# Altium PCB EEM_FMC_Carrier.PcbDoc (part 14 of 19)
Units mm, origin at the board's own origin, x right, y up, seen from the top; angles counter-clockwise.
Board outline 222.9 x 100 mm, 6 copper layers (TopLayer, MidLayer1, MidLayer2, SignalLayer1, Internal Plane 1, BottomLayer), stack 1.528 mm thick; 790 components, 743 nets, 3570 pads, 2277 vias.
Unrouted connection lines stored in the file: 3.
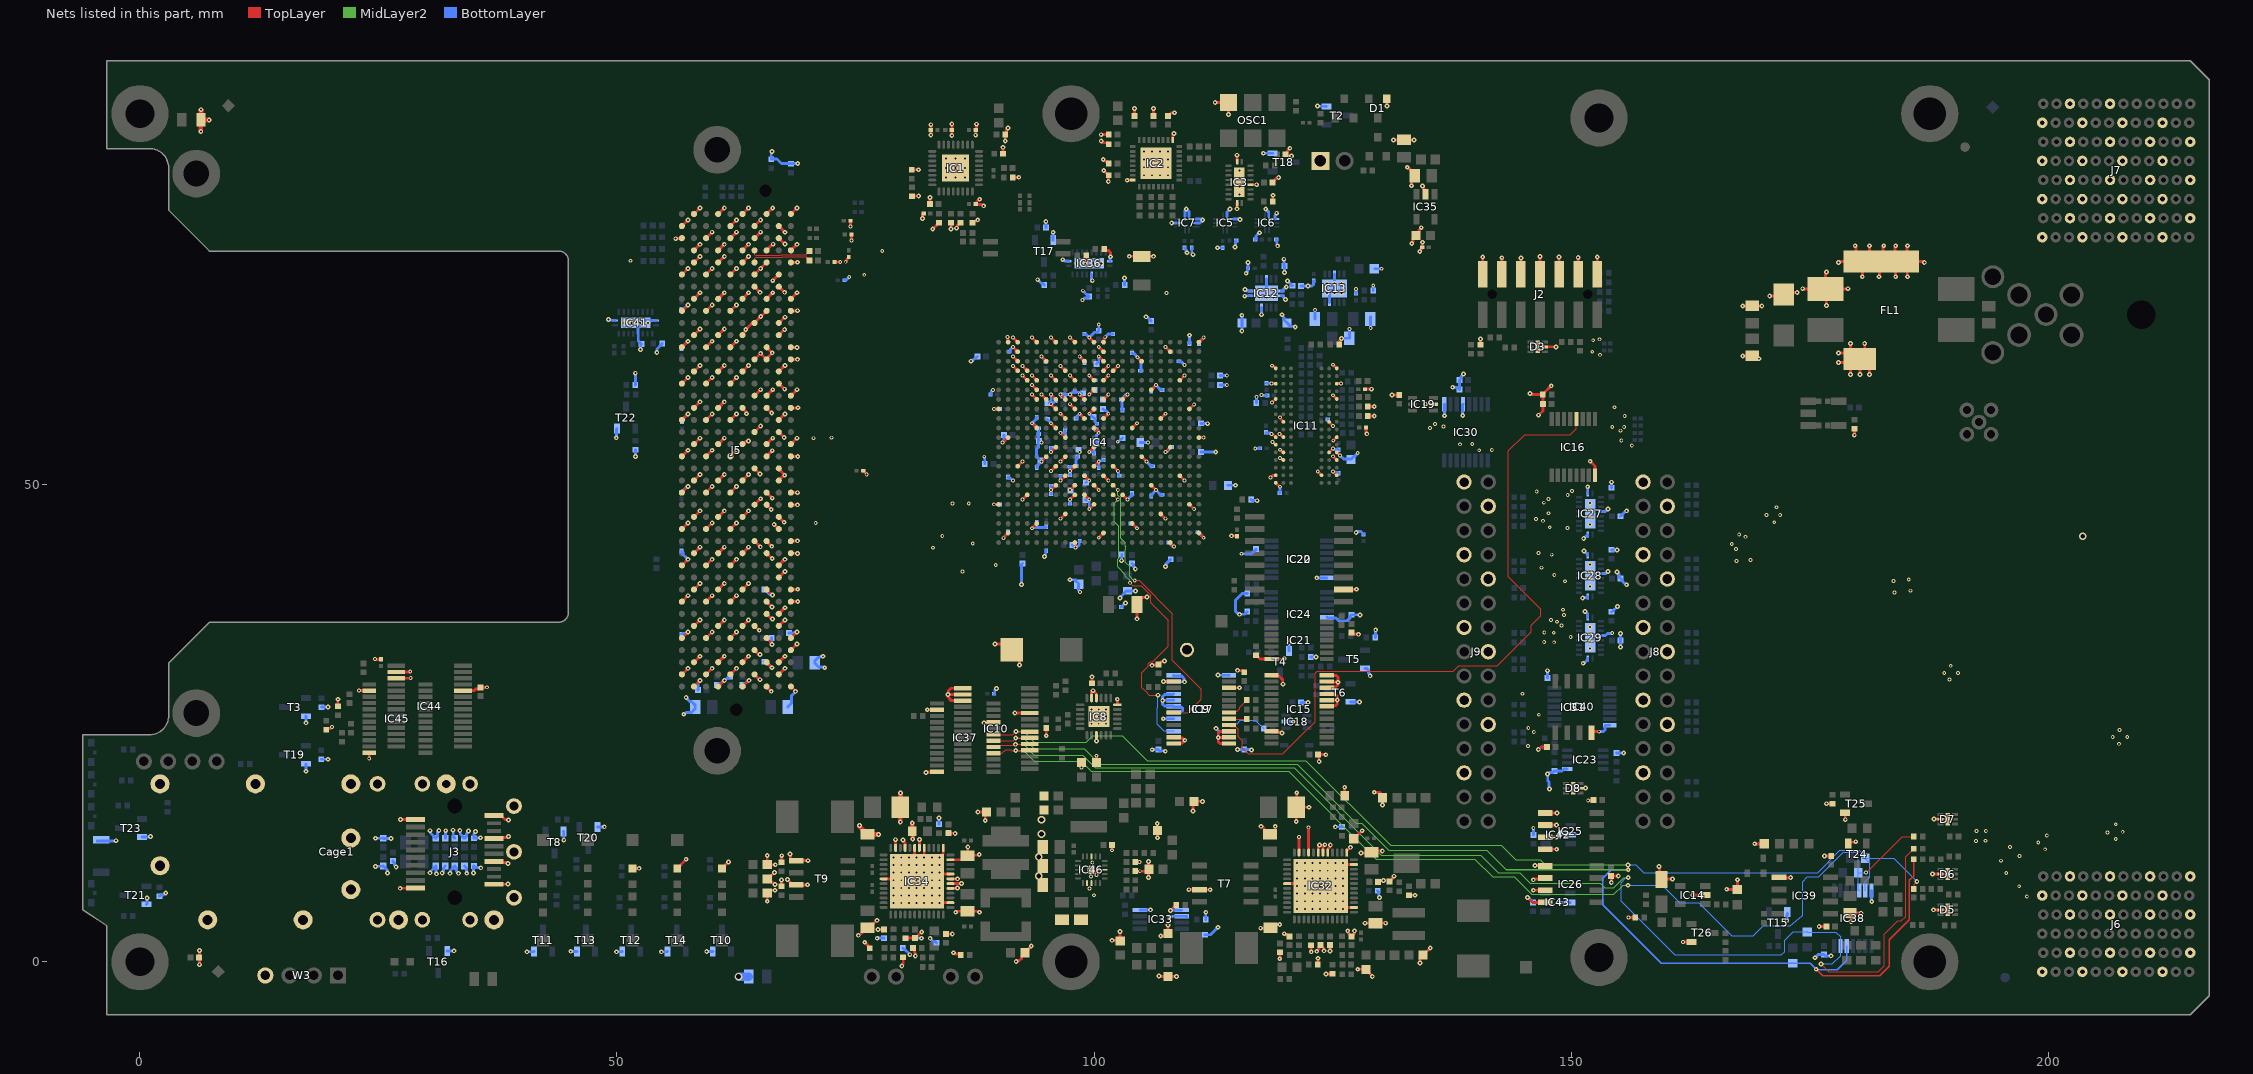
[diagram p16: the nets of this part, all layers, seen from the top]

## Via types
v1: diameter 0.4, hole 0.2, TopLayer to BottomLayer, tented both sides, 1032 vias
v2: diameter 0.5, hole 0.2, TopLayer to BottomLayer, tented both sides, 979 vias
v3: diameter 0.5, hole 0.2, TopLayer to BottomLayer, 162 vias
v4: diameter 0.8, hole 0.5, TopLayer to BottomLayer, tented both sides, 102 vias
v5: diameter 0.6, hole 0.3, TopLayer to BottomLayer, tented both sides, 2 vias

## Nets (pads, with @x,y where several pads share a name; then routed paths per layer and width w, separated by ;. In a path a pad name is that pad's centre, name@x,y a point inside that pad or via, vN(x,y) a via of type N, cw(c..) or ccw(c..) an arc to the next point about the centre after c; other vN are vias at no path point) (continued)
FPGA_JTAG.TDO: IC4.U13 IC17.3 | length 31.9
  TopLayer w0.125: IC4.U13@101.998,48.95 v1(102.498,48.45) ; v1(103.773,39.725) 104.073,39.425 104.941,39.425 105.953,38.413 105.953,37.645 107.798,35.8 107.798,33.1 106.175,31.477 105.907,31.477 105.672,31.241 105.672,30.973 105.023,30.325 105.023,28.716 105.4,28.339 105.409,28.339 105.798,27.95 v2(106.698,27.95)
  MidLayer2 w0.125: v1(102.498,48.45) 102.098,48.05 102.098,46.15 102.598,45.65 102.598,42.324 102.485,42.211 102.485,41.398 103.3,40.583 103.3,40.44 103.745,39.995 103.745,39.753 v1(103.773,39.725)
  BottomLayer w0.125: v2(106.698,27.95) 106.698,26.693 106.622,26.616 106.622,26.284 106.648,26.257 106.648,24.925 107.334,24.239 108.284,24.239 IC17.3@108.348,24.175
FPGA_JTAG.TMS: IC4.T13 IC9.7 | length 30.1
  TopLayer w0.1: v1(104.273,39.975) 104.723,39.975 108.223,36.475 108.223,31.6 111.237,28.586 111.237,27.514 109.848,26.125 IC9.7@108.348,26.125
  TopLayer w0.125: IC4.T13@101.998,49.95 v1(102.498,49.45)
  MidLayer2 w0.1: v1(102.498,49.45) 102.498,48.929 102.798,48.629 102.798,48.611 102.824,48.585 102.824,44.424 103.298,43.95 103.298,43.536 103.324,43.51 103.324,43.24 103.298,43.214 103.298,41.9 103.723,41.475 103.723,40.428 104.077,40.074 104.093,40.074 104.192,39.975 v1(104.273,39.975)
FPGA_JTAG_3V3.TCK: IC9.18 R91.2 | length 2.5
  TopLayer w0.125: IC9.18@114.148,26.125 114.293,26.27 114.993,26.27 115.273,26.55 115.273,26.695 115.781,27.203 115.801,27.203 116.028,27.43 R91.2@116.028,27.45
FPGA_JTAG_3V3.TDI: IC9.16 IC16.12 | length 72
  TopLayer w0.125: IC9.16@114.148,24.825 114.311,24.663 114.861,24.663 115.123,24.4 115.123,23.613 115.548,23.188 115.548,22.4 116.15,21.799 119.797,21.799 121.473,23.475 123.173,25.175 123.173,30.223 123.425,30.475 137.675,30.475 138.25,31.05 142.275,31.05 145.832,34.607 145.832,35.266 146.825,36.259 146.825,36.975 143.436,40.364 143.436,53.56 145.125,55.25 149.925,55.25 150.534,55.859 150.534,56.861 IC16.12@150.573,56.9
FPGA_JTAG_3V3.TDO: IC17.21 R96.1 | length 4.2
  BottomLayer w0.125: IC17.21@114.148,24.825 114.293,24.97 114.993,24.97 115.348,25.325 116.903,25.325 117.53,24.697 117.55,24.697 117.778,24.47 R96.1@117.778,24.45
FPGA_JTAG_3V3.TMS: IC9.17 R89.2 | length 1.9
  TopLayer w0.125: IC9.17@114.148,25.475 114.173,25.45 R89.2@116.028,25.45
GA0: IC10.7 IC37.19 IC38.6 R38.1 R262.2 | length 112.1
  TopLayer w0.09: IC37.19@89.45,23.825 91.498,23.825 v2(91.823,24.15)
  TopLayer w0.114: R38.1@185.93,7.725 185.964,7.759 185.964,8.139 v2(186.25,8.425)
  TopLayer w0.125: v2@91.848,24.125 IC10.7@93.248,24.125
  MidLayer2 w0.09: 144.204,10.7 146.775,10.7 147.322,10.153 v2(155.976,10.153)
  MidLayer2 w0.125: v2(91.823,24.15) 92.623,24.15 93.748,23.025 99.175,23.025 99.85,23.7 102.964,23.7 105.564,21.1 122.21,21.1 131.085,12.225 142.679,12.225 144.204,10.7
  BottomLayer w0.09: v2(155.976,10.153) 156.797,10.153 157.609,9.341
  BottomLayer w0.114: 157.609,9.341 175.841,9.341 178.191,11.691 180.209,11.691 180.468,11.432 180.468,11.232 R262.2@180.85,10.85 ; IC38.6@180.848,7.475 IC38.6@180.848,7.475 180.85,8.425 181.3,8.875 181.3,10.35 180.85,10.8 R262.2@180.85,10.85 ; v2(186.25,8.425) 183.825,10.85 R262.2@180.85,10.85
GA1: IC10.6 IC37.18 IC38.12 R39.1 R260.2 | length 130.5
  TopLayer w0.09: IC37.18@89.45,23.175 91.523,23.175 v2(91.798,23.45)
  TopLayer w0.125: v2@91.823,23.475 IC10.6@93.248,23.475
  TopLayer w0.15: v2(175.7,-0.775) 176.4,-1.475 182.35,-1.475 183.35,-0.475 183.35,2.3 185.476,4.426 185.476,8.526 185.93,8.98 R39.1@185.93,10.75
  MidLayer2 w0.125: v2(91.798,23.45) 92.623,23.45 93.748,22.325 98.975,22.325 100.6,20.7 121.325,20.7 127.5,14.525 128.05,14.525 130.9,11.675 141.175,11.675 143.204,9.646
  MidLayer2 w0.15: 143.204,9.646 v2(155.998,9.646)
  BottomLayer w0.15: v2(155.998,9.646) 154.221,9.646 153.35,8.775 153.35,5.975 159.475,-0.15 R260.2@173.25,-0.15 175.075,-0.15 175.739,-0.814 177.911,-0.814 178.898,0.173 IC38.12@178.898,1.675
GA2: IC10.5 IC37.17 IC38.13 R40.1 R197.2 | length 130.3
  TopLayer w0.09: IC37.17@89.45,22.525 89.63,22.705 91.567,22.705 91.662,22.8 v2(91.773,22.8)
  TopLayer w0.114: v2(176.2,-0.225) 177.025,-1.05 182.2,-1.05 182.825,-0.425 182.825,2.875 184.25,4.3 184.625,4.3 185.075,4.75 185.075,10.995 185.677,11.597 185.697,11.597 185.93,11.83 R40.1@185.93,11.85
  TopLayer w0.125: v2@91.798,22.825 IC10.5@93.248,22.825
  MidLayer2 w0.114: 142.375,9.325 144.625,9.325 145.737,8.213 153.05,8.213 153.513,7.75 154.475,7.75 155.55,8.825 v2(155.998,8.825)
  MidLayer2 w0.125: v2(91.773,22.8) 92.623,22.8 93.748,21.675 98.8,21.675 100.15,20.325 120.967,20.325 130.117,11.175 140.525,11.175 142.375,9.325
  BottomLayer w0.114: v2(155.998,8.825) 155.926,8.753 155.703,8.753 155.25,8.3 155.25,6.35 160.875,0.725 172.05,0.725 172.4,1.075 172.4,2.275 173.269,3.144 174.756,3.144 R197.2@174.775,3.125 177.725,3.125 178.248,2.602 IC38.13@178.248,1.675 178.248,0.648 177.375,-0.225 v2(176.2,-0.225)
GA3: IC10.4 IC37.16 IC38.5 R270.1 R282.2 | length 118.1
  TopLayer w0.09: v1(180.925,9.35) 184.7,13.125 R270.1@185.93,13.125
  TopLayer w0.125: IC37.16@89.45,21.875 90.35,21.875 90.725,22.25 91.3,22.25 91.4,22.15 v2(91.798,22.15) ; v2@91.823,22.175 IC10.4@93.248,22.175
  MidLayer2 w0.125: v2(91.798,22.15) 92.623,22.15 93.748,21.025 98.65,21.025 99.725,19.95 120.423,19.95 129.598,10.775 139.925,10.775 141.8,8.9 144.05,8.9 145.875,7.075 154.5,7.075 155.45,8.025 v2(155.975,8.025)
  BottomLayer w0.09: v2(155.975,8.025) 159.55,8.025 161.4,6.175 163.375,6.175 166.825,2.725 169.1,2.725 170.15,3.775 172.975,3.775 174.236,4.854 174.264,4.883 174.264,8.414 174.775,8.925 175.975,8.925 178.55,11.5 179.825,11.5 180.1,11.225 R282.2@180.1,9.35 ; IC38.5@180.198,7.475 180.1,7.573 R282.2@180.1,9.35 ; v1(180.925,9.35) R282.2@180.1,9.35
GBTCLK0_M2C_N: C200.1 J5.d5 | length 6.5
  TopLayer w0.085: J5.d5@64.418,73.309 64.438,73.328 64.438,73.757 64.518,73.838 67.324,73.838 67.38,73.894 69.861,73.894 69.911,73.844 69.911,73.762 C200.1@70.173,73.5
GBTCLK0_M2C_P: C199.1 J5.d4 | length 6.5
  TopLayer w0.085: J5.d4@64.418,74.579 64.438,74.559 64.438,74.131 64.518,74.05 67.236,74.05 67.292,74.106 69.861,74.106 69.911,74.156 69.911,74.238 C199.1@70.173,74.5
GND: B1.1 C14.1 C15.1 C17.1 C18.1 C19.1 C20.2 C22.1 C23.1 C24.1 C25.1 C26.1 C27.1 C28.1 C31.1 C32.1 C33.1 C34.1 C35.1 C36.1 C37.1 C38.1 C39.1 C40.1 C41.1 C42.1 C43.2 C44.1 C45.1 C46.1 C47.1 C48.1 C49.1 C50.1 C51.1 C61.1 C62.1 C63.1 C64.1 C65.1 C66.1 C67.1 C68.1 C69.1 C70.1 C71.1 C72.1 C74.1 C75.1 C76.1 C77.1 C78.1 C79.1 C80.1 C81.1 C82.1 C83.1 C84.1 C85.1 C86.1 C87.1 C88.1 C89.1 C90.1 C91.1 C92.1 C93.1 C94.1 C95.1 C96.1 C99.1 C100.1 C101.1 C102.1 C103.2 C104.1 C105.1 C106.1 C107.1 C108.1 C109.1 C110.1 C111.1 C112.1 C113.1 C114.1 C115.1 C116.1 C117.1 C118.1 C119.1 C120.1 C121.1 C122.1 C123.1 C124.1 C125.1 C126.1 C127.1 C128.1 C129.1 C130.1 C131.1 C132.1 C133.1 C134.1 C135.1 C136.1 C137.1 C138.1 C139.1 C140.1 C141.1 C142.1 C143.1 C144.1 C145.1 C146.1 C147.1 C148.1 C149.1 C150.1 C151.1 C152.1 C153.1 C154.1 C155.1 C156.1 C157.1 C158.1 C159.1 C160.1 C161.1 C162.1 C163.1 C164.1 C165.1 C166.1 C167.1 C168.1 C169.1 C170.1 C171.1 C172.1 C173.1 C174.1 C175.1 C176.1 C177.1 C178.1 C179.1 C180.1 C181.1 C182.1 C183.1 C184.1 C185.1 C186.1 C187.1 C188.1 C189.1 C190.1 C191.1 C192.1 C193.1 C194.1 C195.1 C196.1 C197.2 C198.2 C201.1 C202.1 C203.1 C204.2 C205.2 C206.1 C207.1 C208.2 C209.2 C212.2 C219.1 C220.1 C221.1 C222.1 C223.1 C224.1 C225.1 C226.1 C228.1 C229.1 C230.1 C231.2 C232.1 C233.1 C234.1 C235.1 C236.1 C238.1 C239.1 C240.1 C241.1 C242.1 C243.1 C245.1 C249.1 C250.1 C251.1 C254.1 C255.1 C257.1 C258.1 C259.1 C260.1 C262.1 C263.1 C265.2 C266.1 C267.1 C268.1 C269.1 C271.1 C272.1 C273.1 C274.1 C277.1 C278.1 C281.1 C282.1 C284.1 C285.1 C286.1 C287.1 C288.1 C289.1 C290.1 C291.1 C292.1 C293.1 C294.1 C295.1 C296.1 C297.1 C298.1 C299.2 C300.1 C301.1 C302.1 C303.1 C304.1 C305.1 C306.1 C307.1 C308.1 C309.1 C310.1 C311.1 C312.1 C313.1 C314.1 C315.1 C316.1 C317.1 C318.1 C319.1 C320.1 C321.1 C322.2 C323.1 Cage1.1 Cage1.2 Cage1.3 Cage1.4 Cage1.5 Cage1.6 Cage1.7 Cage1.8 Cage1.9 Cage1.10 Cage1.11 Cage1.12 Cage1.13 Cage1.14 Cage1.15 Cage1.16 Cage1.17 Cage1.18 Cage1.19 Cage1.20 D1.1 D3.2 D3.7 D5.2 D5.7 D6.2 D6.7 D7.2 D7.7 D8.2 D8.7 D10.2 FL1.4 IC1.33 IC2.9 IC2.24 IC2.33 IC3.5 IC3.11 IC3.20 IC3.21 IC4.A2 IC4.A3 IC4.A5 IC4.A7 IC4.A9 IC4.A11 IC4.A12 IC4.A22 IC4.AA2 IC4.AA12 IC4.AA22 IC4.AB9 IC4.AB19 IC4.B3 IC4.B12 IC4.B19 IC4.C3 IC4.C6 IC4.C10 IC4.C12 IC4.C16 IC4.D3 IC4.D4 IC4.D8 IC4.D12 IC4.D13 IC4.E4 IC4.E5 IC4.E7 IC4.E9 IC4.E11 IC4.E12 IC4.E20 IC4.F5 IC4.F11 IC4.F17 IC4.G5 IC4.G6 IC4.G7 IC4.G8 IC4.G9 IC4.G10 IC4.G12 IC4.G14 IC4.H1 IC4.H7 IC4.H9 IC4.H11 IC4.H21 IC4.J8 IC4.J10 IC4.J12 IC4.J18 IC4.K5 IC4.K7 IC4.K11 IC4.K15 IC4.L2 IC4.L8 IC4.L22 IC4.M7 IC4.M11 IC4.M19 IC4.N6 IC4.N8 IC4.N16 IC4.P3 IC4.P7 IC4.P9 IC4.P11 IC4.P13 IC4.R8 IC4.R10 IC4.R12 IC4.R20 IC4.T7 IC4.T9 IC4.T11 IC4.T17 IC4.U4 IC4.U9 IC4.U10 IC4.U14 IC4.V1 IC4.V11 IC4.V21 IC4.W8 IC4.W18 IC4.Y5 IC4.Y15 IC5.2 IC5.3 IC6.2 IC6.3 IC7.1 IC7.2 IC7.3 IC7.4 IC7.9 IC8.9 IC8.18 IC8.22 IC8.23 IC8.25 IC9.2 IC9.11 IC9.12 IC9.13 IC9.14 IC9.15 IC9.22 IC10.10 IC10.15 IC10.16 IC10.17 IC11.A9 IC11.B1 IC11.B3 IC11.B9 IC11.D1 IC11.D8 IC11.E1 IC11.E2 IC11.E8 IC11.F9 IC11.G1 IC11.G8 IC11.G9 IC11.J2 IC11.J8 IC11.M1 IC11.M9 IC11.P1 IC11.P9 IC11.T1 IC11.T9 IC12.4 IC12.8 IC12.11 IC13.4 IC13.8 IC13.11 IC14.2 IC15.7 IC15.8 IC15.9 IC15.10 IC15.11 IC15.12 IC15.13 IC15.22 IC16.8 IC17.5 IC17.6 IC17.7 IC17.8 IC17.9 IC17.11 IC17.12 IC17.13 IC17.22 IC18.2 IC19.2 IC20.7 IC21.7 IC22.10 IC23.1 IC24.13 IC25.1 IC25.2 IC25.3 IC25.4 IC26.1 IC26.2 IC26.3 IC26.4 IC27.5 IC27.11 IC27.20 IC27.21 IC28.5 IC28.11 IC28.20 IC28.21 IC29.5 IC29.11 IC29.20 IC29.21 IC30.9 IC30.12 IC31.4 IC32.2 IC32.11 IC32.13 IC32.17 IC32.18 IC32.19 IC32.21 IC32.23 IC32.30 IC32.49 IC33.4 IC33.5 IC33.6 IC34.2 IC34.5 IC34.6 IC34.7 IC34.8 IC34.11 IC34.13 IC34.17 IC34.18 IC34.19 IC34.21 IC34.23 IC34.30 IC34.49 IC35.2 IC36.5 IC36.11 IC36.20 IC36.21 IC37.2 IC37.12 IC37.21 IC38.7 IC39.1 IC40.7 IC41.5 IC41.11 IC41.20 IC41.21 IC42.2 IC43.2 IC44.10 IC44.16 IC44.17 IC45.2 IC45.12 IC46.7 IC46.8 IC46.13 IC46.18 IC46.21 J1.1 J2.1 J2.3 J2.5 J2.7 J2.9 J2.11 J2.13 J3.1 J3.10 J3.11 J3.14 J3.17 J3.20 J5.a1 J5.a4 J5.a5 J5.a8 J5.a9 J5.a12 J5.a13 J5.a16 J5.a17 J5.a20 J5.a21 J5.a24 J5.a25 J5.a28 J5.a29 J5.a32 J5.a33 J5.a36 J5.a37 J5.a40 J5.b2 J5.b3 J5.b6 J5.b7 J5.b10 J5.b11 J5.b14 J5.b15 J5.b18 J5.b19 J5.b22 J5.b23 J5.b26 J5.b27 J5.b30 J5.b31 J5.b34 J5.b35 J5.b38 J5.b39 J5.c1 J5.c4 J5.c5 J5.c8 J5.c9 J5.c12 J5.c13 J5.c16 J5.c17 J5.c20 J5.c21 J5.c24 J5.c25 J5.c28 J5.c29 J5.c32 J5.c33 J5.c34 J5.c36 J5.c38 J5.c40 J5.d2 J5.d3 J5.d6 J5.d7 J5.d10 J5.d13 J5.d16 J5.d19 J5.d22 J5.d25 J5.d28 J5.d35 J5.d37 J5.d39 J5.e1 J5.e4 J5.e5 J5.e8 J5.e11 J5.e14 J5.e17 J5.e20 J5.e23 J5.e26 J5.e29 J5.e32 J5.e35 J5.e38 J5.e40 J5.f2 J5.f3 J5.f6 J5.f9 J5.f12 J5.f15 J5.f18 J5.f21 J5.f24 J5.f27 J5.f30 J5.f33 J5.f36 J5.f39 J5.g1 J5.g4 J5.g5 J5.g8 J5.g11 J5.g14 J5.g17 J5.g20 J5.g23 J5.g26 J5.g29 J5.g32 J5.g35 J5.g38 J5.g40 J5.h3 J5.h6 J5.h9 J5.h12 J5.h15 J5.h18 J5.h21 J5.h24 J5.h27 J5.h30 J5.h33 J5.h36 J5.h39 J5.j1 J5.j4 J5.j5 J5.j8 J5.j11 J5.j14 J5.j17 J5.j20 J5.j23 J5.j26 J5.j29 J5.j32 J5.j35 J5.j38 J5.j40 J5.k2 J5.k3 J5.k6 J5.k9 J5.k12 J5.k15 J5.k18 J5.k21 J5.k24 J5.k27 J5.k30 J5.k33 J5.k36 J5.k39 J6.A2 J6.A4 J6.A6 J6.C1 J6.C5 J6.D2 J6.D4 J6.D6 J6.F1 J6.F5 J6.G2 J6.G4 J6.G6 J6.I1 J6.I5 J6.J2 J6.J4 J6.J6 J6.L1 J6.L5 J7.A2 J7.A4 J7.A6 J7.C1 J7.C3 J7.C5 J7.C7 J7.D2 J7.D4 J7.D6 J7.F1 J7.F3 J7.F5 J7.F7 J7.G2 J7.G4 J7.G6 J7.G8 J7.I1 J7.I3 J7.I5 J7.I7 J7.J2 J7.J4 J7.J6 J7.J8 J7.L1 J7.L3 J7.L5 J7.L7 J8.1 J8.4 J8.7 J8.10 J8.13 J8.16 J8.19 J8.22 J8.25 J9.1 J9.4 J9.7 J9.10 J9.13 J9.16 J9.19 J9.22 J9.25 L4.1 LD4.1 LD5.1 LD12.1 OSC1.3 R5.2 R7.2 R9.2 R11.2 R12.1 R13.1 R15.2 R16.2 R23.2 R36.1 R45.1 R66.1 R67.1 R68.1 R69.1 R72.1 R75.1 R79.2 R80.2 R83.1 R84.1 R94.1 R95.1 R104.2 R110.2 R115.1 R116.1 R117.2 R118.1 R119.2 R124.1 R126.2 R129.1 R181.2 R182.2 R183.2 R185.1 R191.1 R192.2 R194.1 R198.1 R204.1 R205.1 R210.1 R211.1 R212.1 R216.1 R217.1 R218.1 R219.1 R221.1 R222.2 R223.2 R227.1 R231.1 R232.1 R235.1 R240.1 R241.1 R244.1 R252.1 R253.1 R254.2 R255.1 R259.1 R269.1 R273.1 R284.1 R285.1 R286.1 R290.1 SW2.2 T2.2 T3.2 T4.2 T5.2 T6.2 T7.3 T8.2 T9.1 T9.3 T10.2 T11.2 T12.2 T13.2 T14.2 T15.2 T16.2 T17.2 T18.2 T19.2 T20.2 T21.2 T22.2 T23.2 T24.2 T25.2 T26.2 W3.4 | length 869.9
  TopLayer w0.3: v2(6.248,-0.3) 6.223,-0.275 6.223,0.425 C212.2@6.198,0.45 6.248,0.5 v2(6.248,1.2) ; R285.1@19.525,24.305 19.665,24.445 19.943,24.445 20.098,24.6 v1(20.125,24.6) ; R286.1@20.75,26.795 20.726,26.819 20.726,27.501 v2(20.75,27.525) ; v1(22.95,28.45) 22.977,28.45 22.999,28.429 24.021,28.429 IC45.2@24.025,28.425 ; v1(24.025,21.325) IC45.12@24.025,21.925 ; v1(24.65,31.725) 24.677,31.725 24.702,31.7 C114.1@25.275,31.7 ; IC44.17@26.853,29.725 28.323,29.725 28.348,29.75 v1(28.375,29.75) ; IC44.16@26.853,30.375 28.248,30.375 28.298,30.425 v1(28.325,30.425) ; v2(27.275,7.7) 27.287,7.712 28.888,7.712 J3.10@28.9,7.725 ; v2(27.3,14.925) J3.1@28.9,14.925 ; IC44.10@33.853,28.425 33.859,28.432 35.032,28.432 35.197,28.597 35.547,28.597 35.705,28.755 36.328,28.755 36.348,28.775 v1(36.375,28.775) ; J3.11@37.1,8.125 37.113,8.137 38.562,8.137 v2(38.575,8.15) ; J3.14@37.1,10.525 37.2,10.425 38.396,10.425 38.521,10.3 v2(38.575,10.3) ; J3.17@37.1,12.925 37.2,13.025 38.471,13.025 38.571,13.125 v2(38.625,13.125) ; J3.20@37.1,15.325 37.85,15.325 38.262,14.913 38.587,14.913 v2(38.625,14.875) ; LD12.1@51.625,9.787 51.631,9.794 52.319,9.794 v2(52.325,9.8) ; v2(56.148,75.8) 56.182,75.834 56.784,75.834 J5.k3@56.798,75.849 ; LD5.1@56.312,9.787 57.25,10.725 v2(57.25,10.75) ; J5.k39@56.798,30.129 57.429,30.76 v2(57.438,30.76) ; J5.k36@56.798,33.939 57.429,34.57 v2(57.438,34.57) ; J5.k33@56.798,37.749 57.429,38.38 v2(57.438,38.38) ; J5.k30@56.798,41.559 57.429,42.19 v2(57.438,42.19) ; J5.k27@56.798,45.369 57.429,46 v2(57.438,46) ; J5.k24@56.798,49.179 57.429,49.81 v2(57.438,49.81) ; J5.k21@56.798,52.989 57.429,53.62 v2(57.438,53.62) ; J5.k18@56.798,56.799 57.429,57.43 v2(57.438,57.43) ; J5.k15@56.798,60.609 57.429,61.24 v2(57.438,61.24) ; J5.k12@56.798,64.419 57.429,65.05 v2(57.438,65.05) ; J5.k9@56.798,68.229 57.429,68.86 v2(57.438,68.86) ; J5.k6@56.798,72.039 57.429,72.67 v2(57.438,72.67) ; J5.k2@56.798,77.119 57.429,77.75 v2(57.438,77.75) ; J5.j40@58.068,28.859 58.699,29.49 v2(58.708,29.49) ; J5.j38@58.068,31.399 58.699,32.03 v2(58.708,32.03) ; J5.j35@58.068,35.209 58.699,35.84 v2(58.708,35.84) ; J5.j32@58.068,39.019 58.699,39.65 v2(58.708,39.65) ; J5.j29@58.068,42.829 58.699,43.46 v2(58.708,43.46) ; J5.j26@58.068,46.639 58.699,47.27 v2(58.708,47.27) ; J5.j23@58.068,50.449 58.699,51.08 v2(58.708,51.08) ; J5.j20@58.068,54.259 58.699,54.89 v2(58.708,54.89) ; J5.j17@58.068,58.069 58.699,58.7 v2(58.708,58.7) ; J5.j14@58.068,61.879 58.699,62.51 v2(58.708,62.51) ; J5.j11@58.068,65.689 58.699,66.32 v2(58.708,66.32) ; J5.j8@58.068,69.499 58.699,70.13 v2(58.708,70.13) ; J5.j5@58.068,73.309 58.699,73.94 v2(58.708,73.94) ; J5.j4@58.068,74.579 58.699,75.21 v2(58.708,75.21) ; J5.j1@58.068,78.389 58.699,79.02 v2(58.708,79.02) ; J5.h39@59.338,30.129 59.969,30.76 v2(59.978,30.76) ; J5.h36@59.338,33.939 59.969,34.57 v2(59.978,34.57) ; J5.h33@59.338,37.749 59.969,38.38 v2(59.978,38.38) ; J5.h30@59.338,41.559 59.969,42.19 v2(59.978,42.19) ; J5.h27@59.338,45.369 59.969,46 v2(59.978,46) ; J5.h24@59.338,49.179 59.969,49.81 v2(59.978,49.81) ; J5.h21@59.338,52.989 59.969,53.62 v2(59.978,53.62) ; J5.h18@59.338,56.799 59.969,57.43 v2(59.978,57.43) ; J5.h15@59.338,60.609 59.969,61.24 v2(59.978,61.24) ; J5.h12@59.338,64.419 59.969,65.05 v2(59.978,65.05) ; J5.h9@59.338,68.229 59.969,68.86 v2(59.978,68.86) ; J5.h6@59.338,72.039 59.969,72.67 v2(59.978,72.67) ; J5.h3@59.338,75.849 59.969,76.48 v2(59.978,76.48) ; J5.g40@60.608,28.859 61.239,29.49 v2(61.248,29.49) ; J5.g38@60.608,31.399 61.239,32.03 v2(61.248,32.03) ; J5.g35@60.608,35.209 61.239,35.84 v2(61.248,35.84) ; J5.g32@60.608,39.019 61.239,39.65 v2(61.248,39.65) ; J5.g29@60.608,42.829 61.239,43.46 v2(61.248,43.46) ; J5.g26@60.608,46.639 61.239,47.27 v2(61.248,47.27) ; J5.g23@60.608,50.449 61.239,51.08 v2(61.248,51.08) ; J5.g20@60.608,54.259 61.239,54.89 v2(61.248,54.89) ; J5.g17@60.608,58.069 61.239,58.7 v2(61.248,58.7) ; J5.g14@60.608,61.879 61.239,62.51 v2(61.248,62.51) ; J5.g11@60.608,65.689 61.239,66.32 v2(61.248,66.32) ; J5.g8@60.608,69.499 61.239,70.13 v2(61.248,70.13) ; J5.g5@60.608,73.309 61.239,73.94 v2(61.248,73.94) ; J5.g4@60.608,74.579 61.239,75.21 v2(61.248,75.21) ; J5.g1@60.608,78.389 61.239,79.02 v2(61.248,79.02) ; LD4.1@61,9.787 61.663,10.45 v2(61.675,10.45) ; J5.f39@61.878,30.129 62.509,30.76 v2(62.518,30.76) ; J5.f36@61.878,33.939 62.509,34.57 v2(62.518,34.57) ; J5.f33@61.878,37.749 62.509,38.38 v2(62.518,38.38) ; J5.f30@61.878,41.559 62.509,42.19 v2(62.518,42.19) ; J5.f27@61.878,45.369 62.509,46 v2(62.523,46) ; J5.f24@61.878,49.179 62.509,49.81 v2(62.518,49.81) ; J5.f21@61.878,52.989 62.509,53.62 v2(62.518,53.62) ; J5.f18@61.878,56.799 62.509,57.43 v2(62.518,57.43) ; J5.f15@61.878,60.609 62.509,61.24 v2(62.518,61.24) ; J5.f12@61.878,64.419 62.509,65.05 v2(62.518,65.05) ; J5.f9@61.878,68.229 62.509,68.86 v2(62.518,68.86) ; J5.f6@61.878,72.039 62.509,72.67 v2(62.518,72.67) ; J5.f3@61.878,75.849 62.509,76.48 v2(62.518,76.48) ; J5.f2@61.878,77.119 62.509,77.75 v2(62.518,77.75) ; J5.e40@63.148,28.859 63.166,28.859 63.809,29.502 v2(63.826,29.502) ; J5.e38@63.148,31.399 63.779,32.03 v2(63.788,32.03) ; J5.e35@63.148,35.209 63.779,35.84 v2(63.788,35.84) ; J5.e32@63.148,39.019 63.779,39.65 v2(63.788,39.65) ; J5.e29@63.148,42.829 63.779,43.46 v2(63.788,43.46) ; J5.e26@63.148,46.639 63.779,47.27 v2(63.788,47.27) ; J5.e23@63.148,50.449 63.779,51.08 v2(63.788,51.08) ; J5.e20@63.148,54.259 63.24,54.259 63.543,54.562 63.735,54.562 v2(63.773,54.6) ; J5.e17@63.148,58.069 63.148,58.048 63.535,57.661 63.535,57.488 v2(63.573,57.45) ; J5.e14@63.148,61.879 63.779,62.51 v2(63.788,62.51) ; J5.e11@63.148,65.689 63.148,65.781 63.46,66.092 63.46,66.237 v2(63.498,66.275) 64.117,66.894 64.353,66.894 J5.d10@64.418,66.959 64.418,66.995 v2(65.073,67.65) 65.109,67.65 J5.c9@65.688,68.229 ; J5.e8@63.148,69.499 63.779,70.13 v2(63.788,70.13) ; J5.e5@63.148,73.309 63.779,73.94 v2(63.788,73.94) ; J5.e4@63.148,74.579 63.779,75.21 v2(63.788,75.21) ; J5.e1@63.148,78.389 63.779,79.02 v2(63.788,79.02) ; J5.d39@64.418,30.129 64.972,29.575 v2(64.998,29.575) ; J5.d37@64.418,32.669 64.849,32.238 64.96,32.238 v2(64.998,32.2) ; J5.d35@64.418,35.209 64.877,34.75 v2(64.923,34.75) ; J5.d28@64.418,44.099 65.017,43.5 v2(65.023,43.5) ; J5.d25@64.418,47.909 65.049,48.54 v2(65.058,48.54) ; J5.d22@64.418,51.719 64.418,51.705 v2(64.998,51.125) ; J5.d19@64.418,55.529 65.049,56.16 v2(65.058,56.16) ; J5.d16@64.418,59.339 65.049,59.97 v2(65.058,59.97) ; J5.d13@64.418,63.149 65.049,63.78 v2(65.058,63.78) 65.688,63.15 65.688,63.24 66.273,63.825 v2(66.273,63.831) ; J5.d7@64.418,70.769 64.418,70.763 65,70.181 v2(65,70.175) ; J5.d6@64.418,72.039 65.049,72.67 v2(65.058,72.67) 65.688,73.3 J5.c5@65.688,73.309 ; J5.d3@64.418,75.849 65.049,76.48 v2(65.058,76.48) ; J5.d2@64.418,77.119 65.049,77.75 v2(65.058,77.75) ; J5.c40@65.688,28.859 65.688,28.835 v2(66.173,28.35) ; J5.c38@65.688,31.399 65.688,31.385 v2(66.248,30.825) ; J5.c36@65.688,33.939 66.21,33.417 66.21,33.313 v2(66.248,33.275) ; J5.c34@65.688,36.479 66.204,35.963 66.26,35.963 v2(66.298,35.925) ; J5.c33@65.688,37.749 66.237,37.2 v2(66.248,37.2) ; J5.c32@65.688,39.019 66.257,38.45 v2(66.298,38.45) ; J5.c29@65.688,42.829 66.242,42.275 v2(66.273,42.275) ; J5.c28@65.688,44.099 65.688,44.085 v2(66.223,43.55) ; J5.c25@65.688,47.909 66.173,47.424 v2(66.173,47.406) ; J5.c24@65.688,49.179 66.267,48.6 v2(66.273,48.6) ; J5.c21@65.688,52.989 65.688,52.99 v2(66.273,53.575) ; J5.c20@65.688,54.259 66.319,54.89 v2(66.328,54.89) ; J5.c17@65.688,58.069 65.688,58.06 v2(66.223,57.525) ; J5.c16@65.688,59.339 66.319,59.97 v2(66.328,59.97) ; J5.c12@65.688,64.419 65.688,64.41 v2@66.27,63.828 ; J5.c8@65.688,69.499 66.32,70.131 v2(66.328,70.131) ; J5.c4@65.688,74.579 66.334,75.225 v2(66.373,75.225) ; J5.c1@65.688,78.389 66.319,79.02 v2(66.328,79.02) ; v2(65.748,6.35) C273.1@65.748,7.2 66.048,7.5 v2(66.573,7.5) ; v2(65.748,11.15) C272.1@65.748,10.2 65.773,10.175 v2(66.598,10.175) ; v2(66.325,71.4) 66.325,71.403 66.958,72.036 J5.b6@66.958,72.039 ; v2(66.473,45.85) 66.477,45.85 J5.b27@66.958,45.369 ; v2(66.498,9.375) 66.148,9.025 66.073,9.025 C274.1@65.748,8.7 66.073,8.375 66.297,8.375 v2(66.573,8.1) ; J5.b39@66.958,30.129 67.589,30.76 v2(67.598,30.76) ; J5.b38@66.958,31.399 67.589,32.03 v2(67.598,32.03) ; J5.b35@66.958,35.209 67.589,35.84 v2(67.598,35.84) ; J5.b34@66.958,36.479 67.589,37.11 v2(67.598,37.11) ; J5.b31@66.958,40.289 67.589,40.92 v2(67.598,40.92) ; J5.b30@66.958,41.559 67.589,42.19 v2(67.598,42.19) ; J5.b26@66.958,46.639 v2(67.523,46.075) ; J5.b23@66.958,50.449 67.471,50.962 67.535,50.962 v2(67.573,51) ; J5.b22@66.958,51.719 66.958,51.667 v2@67.573,51.052 ; J5.b19@66.958,55.529 66.958,55.515 v2(67.523,54.95) ; J5.b18@66.958,56.799 67.589,57.43 v2(67.598,57.43) ; J5.b15@66.958,60.609 67.542,60.025 v2(67.573,60.025) ; J5.b14@66.958,61.879 67.589,62.51 v2(67.598,62.51) ; J5.b11@66.958,65.689 67.544,66.275 v2(67.573,66.275) ; J5.b10@66.958,66.959 66.982,66.959 v2(67.598,67.575) ; J5.b7@66.958,70.769 67.552,70.175 v2(67.573,70.175) ; J5.b3@66.958,75.849 67.557,75.25 v2(67.598,75.25) ; J5.b2@66.958,77.119 67.602,76.475 v2(67.623,76.475) ; R222.2@67.248,7.92 v2(67.248,8.575) ; R223.2@67.248,10.42 67.261,10.432 67.261,11.113 v2(67.273,11.125) ; v2(67.873,8.625) 68.173,8.325 68.173,8.215 68.323,8.065 T9.3@68.798,8.065 68.803,8.07 69.968,8.07 v2(69.973,8.075) ; v2(68.123,11.3) 68.123,11.246 68.182,11.187 68.182,10.755 68.332,10.605 T9.1@68.798,10.605 70.018,10.605 v2(70.023,10.6) ; J5.a40@68.228,28.859 68.698,28.389 v2(68.698,28.35) ; J5.a37@68.228,32.669 68.859,33.3 v2(68.868,33.3) ; J5.a36@68.228,33.939 68.859,34.57 v2(68.868,34.57) ; J5.a33@68.228,37.749 68.241,37.762 68.935,37.762 v2(68.948,37.775) ; J5.a32@68.228,39.019 68.244,39.034 68.932,39.034 v2(68.948,39.05) ; J5.a29@68.228,42.829 68.894,42.829 v2(68.923,42.8) ; J5.a28@68.228,44.099 68.897,44.099 v2(68.923,44.125) ; J5.a25@68.228,47.909 68.237,47.9 v2(68.923,47.9) ; J5.a24@68.228,49.179 68.232,49.175 v2(68.923,49.175) ; J5.a21@68.228,52.989 68.242,52.975 v2(68.948,52.975) ; J5.a20@68.228,54.259 68.859,54.89 v2(68.868,54.89) ; J5.a17@68.228,58.069 68.967,58.069 v2(68.973,58.075) ; J5.a16@68.228,59.339 68.859,59.97 v2(68.868,59.97) ; J5.a13@68.228,63.149 68.922,63.149 v2(68.923,63.15) ; J5.a12@68.228,64.419 68.245,64.402 68.871,64.402 v2(68.873,64.4) ; J5.a9@68.228,68.229 68.902,68.229 v2(68.923,68.25) ; J5.a8@68.228,69.499 68.86,70.131 v2(68.868,70.131) ; J5.a5@68.228,73.309 68.907,73.309 v2(68.923,73.325) ; J5.a4@68.228,74.579 68.859,75.21 v2(68.868,75.21) ; J5.a1@68.228,78.389 68.859,79.02 v2(68.868,79.02) ; C293.1@72.798,73.35 v1(73.398,73.35) ; v1(73.973,73.375) 73.973,73.402 74.123,73.552 74.123,73.675 74.298,73.85 C171.1@74.298,73.875 ; v1(74.473,77.075) C290.1@74.473,77.675 ; v1(74.573,75.6) C176.1@74.573,76.25 ; v2(75.298,2.775) 75.336,2.813 75.436,2.813 75.673,3.051 75.673,3.15 76.073,3.55 C267.1@76.248,3.55 76.648,3.95 76.848,3.95 v2(77.248,4.35) ; C193.1@75.798,51.475 75.823,51.475 75.873,51.425 75.873,51.4 76.173,51.1 v1(76.173,51.087) ; v2(75.973,2.05) 76.338,1.685 76.338,1.56 76.478,1.42 R219.1@76.498,1.42 ; v2(77.348,3.4) C271.1@77.998,3.4 ; IC34.30@77.95,8.699 IC34.49@78.747,8.699 ; v2(79.198,12.8) 79.2,12.798 IC34.23@79.2,11.949 ; v2(79.855,-0.441) 79.855,-0.387 80.011,-0.231 80.011,0.468 R217.1@79.998,0.48 ; v2(79.973,12.775) 79.973,12.727 80.2,12.499 IC34.21@80.2,11.949 ; R241.1@80.248,2.48 81.228,2.48 C285.1@81.248,2.5 81.599,2.851 81.657,2.851 81.931,3.125 v2(81.948,3.125) ; R16.2@80.9,83.02 v2(81.595,83.02) ; R15.2@80.925,80.26 v2(81.62,80.26) ; R232.1@81.028,1.45 81.168,1.31 81.168,0.98 81.286,0.862 81.286,0.613 v2(81.273,0.6) ; IC34.19@81.2,11.949 81.2,8.699 IC34.49@81.45,8.449 ; v2(81.698,12.825) 81.7,12.823 IC34.18@81.7,11.949 ; v2(82.023,77.9) 82.023,78.325 82.073,78.375 82.073,78.4 82.123,78.45 C35.1@82.148,78.45 ; IC34.17@82.2,11.949 82.2,9.199 IC34.49@81.45,8.449 ; v2(82.4,19.85) 82.438,19.888 83.512,19.888 IC37.12@83.55,19.925 ; v2(82.525,26.425) IC37.2@83.55,26.425 ; C38.1@82.798,79.45 v2(82.798,80.125) ; v2(82.898,86.675) C33.1@82.898,87.2 v2(82.898,87.75) ; v2(83.093,76.825) 83.588,77.32 83.588,77.34 83.728,77.48 R11.2@83.748,77.48 ; v3(83.798,9.35) 83.949,9.199 IC34.8@84.95,9.199 ; v3(83.798,10.95) 83.951,10.95 84.15,11.149 84.15,11.302 84.2,11.352 IC34.13@84.2,11.949 ; C277.1@84.498,2.9 84.511,2.913 85.136,2.913 v2(85.148,2.925) ; C281.1@84.748,13.5 84.773,13.475 85.423,13.475 v2(85.448,13.45) ; IC34.2@84.95,6.199 83.7,6.199 IC34.49@81.45,8.449 ; IC34.5@84.95,7.699 85.658,7.699 v2(85.695,7.736) ; IC34.6@84.95,8.199 86.101,8.199 v2(86.106,8.204) ; IC34.7@84.95,8.699 v2(85.688,8.699) ; IC34.11@84.95,10.699 86.172,10.699 86.573,11.1 C268.1@86.748,11.1 C268.1@86.773,11.125 ; v2(84.998,76.825) R9.2@84.998,77.48 ; v2(85.098,86.6) C36.1@85.098,87.2 v2(85.098,87.825) ; v2(85.273,0.952) 85.327,0.952 85.442,0.838 85.89,0.838 R218.1@86.028,0.7 ; v2(85.498,5.2) 85.552,5.2 85.652,5.3 C269.1@86.748,5.3 87.844,5.3 87.944,5.2 v2(87.998,5.2) ; v2(85.598,76.9) 85.673,76.975 85.673,77.155 85.838,77.32 85.838,77.34 85.978,77.48 R7.2@85.998,77.48 ; IC10.17@86.248,27.375 86.244,27.379 84.976,27.379 84.903,27.452 84.903,27.572 84.698,27.776 v2(84.698,28.025) ; IC10.16@86.248,28.025 v2(84.698,28.025) ; IC10.15@86.248,28.675 84.998,28.675 84.718,28.395 84.718,28.045 v2(84.698,28.025) ; v2(86.773,12.025) C268.1@86.773,11.125 ; R5.2@87.248,77.48 87.388,77.62 87.661,77.62 v2(87.818,77.777) v2(87.818,77.777) ; C34.1@87.598,79.45 87.648,79.4 88.222,79.4 88.383,79.239 v2(88.437,79.239) ; v2(87.598,86.65) C37.1@87.598,87.2 87.623,87.2 87.673,87.25 v2(87.673,87.8) ; C34.1@87.623,79.45 87.673,79.5 87.673,79.653 87.91,79.89 87.977,79.89 v2(88.015,79.928) ; v2(87.823,15.7) C282.1@88.748,15.7 88.607,15.559 88.607,14.809 v2(88.598,14.8) ; v2(87.973,11.25) 87.919,11.25 87.835,11.166 86.814,11.166 C268.1@86.773,11.125 ; v2(88.475,25.049) 88.513,25.087 89.412,25.087 IC37.21@89.45,25.125 ; v1(89.498,47.956) 89.504,47.95 IC4.V1@89.998,47.95 ; v1(89.498,57.95) IC4.H1@89.998,57.95 ; v2(89.623,33.3) 90.823,33.3 C103.2@91.398,32.725 92.198,31.925 v2(92.198,31.1) ; v1(90.423,54.425) 90.442,54.444 90.492,54.444 IC4.L2@90.998,54.95 ; C15.1@90.448,84.7 v2(90.448,85.375) ; v1(90.498,44.407) 90.517,44.426 90.517,44.469 IC4.AA2@90.998,44.95 ; v2(90.698,86.025) C32.1@90.698,86.7 90.814,86.816 90.814,87.241 v2(90.973,87.4) ; v1(90.948,65.5) 90.967,65.481 90.967,64.981 IC4.A2@90.998,64.95 ; R12.1@91.468,82.2 91.489,82.221 v2@92.1,82.221 ; v1(91.498,62.45) IC4.D3@91.998,61.95 ; v1(91.498,63.45) IC4.C3@91.998,62.95 ; v1(91.498,64.45) IC4.B3@91.998,63.95 ; v1(91.498,65.45) IC4.A3@91.998,64.95 ; v2(91.698,26.075) IC10.10@93.248,26.075 ; v2(91.84,0.03) 91.894,0.03 91.994,0.13 92.178,0.13 92.423,0.375 92.423,0.625 C278.1@92.748,0.95 93.423,1.625 v2(93.423,1.65) ; IC4.P3@91.998,51.95 v1(92.498,52.45) ; v1(92.498,48.45) IC4.U4@92.998,48.95 ; v1(92.498,62.45) IC4.D4@92.998,61.95 ; v1(92.498,61.449) IC4.E4@92.998,60.95 ; v1(93.498,45.45) IC4.Y5@93.998,45.95 ; v1(93.498,56.45) IC4.K5@93.998,55.95 ; v1(93.498,59.45) IC4.G5@93.998,58.95 ; v1(93.498,60.45) IC4.F5@93.998,59.95 ; v1(93.498,61.449) IC4.E5@93.998,60.95 ; v1(93.498,65.45) IC4.A5@93.998,64.95 ; v1(94.498,52.45) IC4.N6@94.998,52.95 ; v1(94.498,59.45) IC4.G6@94.998,58.95 ; v1(94.498,63.45) IC4.C6@94.998,62.95 ; v2(94.998,23.7) C77.1@94.998,24.5 ; v1(95.498,49.45) IC4.T7@95.998,49.95 ; v1(95.498,51.45) IC4.P7@95.998,51.95 ; v1(95.498,53.45) IC4.M7@95.998,53.95 ; v1(95.498,56.45) IC4.K7@95.998,55.95 ; v1(95.498,58.45) IC4.H7@95.998,57.95 ; v1(95.498,59.45) IC4.G7@95.998,58.95 ; v1(95.498,61.45) IC4.E7@95.998,60.95 ; v1(95.498,65.45) IC4.A7@95.998,64.95 ; v2(95.723,76.475) v2@95.761,76.437 ; v1(96.498,50.451) v1(96.498,50.451) IC4.R8@96.998,50.95 ; v1(96.498,46.45) IC4.W8@96.998,46.95 ; v1(96.498,52.45) IC4.N8@96.998,52.95 ; v1(96.498,55.45) IC4.L8@96.998,54.95 ; v1(96.498,57.45) IC4.J8@96.998,56.95 ; v1(96.498,59.45) IC4.G8@96.998,58.95 ; v1(96.498,62.45) IC4.D8@96.998,61.95 ; v1(97.498,48.45) IC4.U9@97.998,48.95 ; v1(97.498,49.45) IC4.T9@97.998,49.95 ; v1(97.498,51.45) IC4.P9@97.998,51.95 ; v1(97.498,58.45) IC4.H9@97.998,57.95 ; v1(97.498,59.45) IC4.G9@97.998,58.95 ; v1(97.498,61.45) IC4.E9@97.998,60.95 ; v1(97.498,65.45) IC4.A9@97.998,64.95 ; IC4.AB9@97.998,43.95 98.036,43.912 98.036,43.77 98.048,43.759 v1(98.048,43.42) ; v1(98.498,57.45) IC4.J10@98.998,56.95 ; v1(98.498,59.45) IC4.G10@98.998,58.95 ; v1(98.498,63.45) IC4.C10@98.998,62.95 ; v1(98.69,20.369) 98.69,20.865 C240.1@98.7,20.875 ; IC4.U10@98.998,48.95 v1(99.498,48.45) ; IC4.R10@98.998,50.95 v1(99.498,50.45) ; v3(99.081,73.2) 99.12,73.238 99.12,73.885 R79.2@99.174,73.939 ; v1(99.498,47.45) IC4.V11@99.998,47.95 ; v1(99.498,53.45) IC4.M11@99.998,53.95 ; v1(99.498,57.45) IC4.H11@99.998,57.95 ; v1(99.498,59.45) IC4.F11@99.998,59.95 ; v1(99.498,61.45) IC4.E11@99.998,60.95 ; v1(99.498,65.45) IC4.A11@99.998,64.95 ; IC8.23@99.748,27.65 99.748,28.221 99.898,28.371 v2(99.898,28.425) 100.248,28.075 IC8.22@100.248,27.65 ; C74.1@99.798,29.2 v2(99.798,29.875) ; IC4.T11@99.998,49.95 v1(100.498,49.45) ; IC4.P11@99.998,51.95 v1(100.498,52.45) ; IC4.K11@99.998,55.95 v1(100.498,55.45) ; IC8.9@100.248,23.75 100.248,23.145 v2(100.256,23.136) ; v1(100.25,9.1) 100.25,9.45 v1(100.5,9.7) ; C239.1@100.25,20.875 v1(100.25,21.6) ; v1(100.498,44.45) IC4.AA12@100.998,44.95 ; v1(100.498,63.45) IC4.C12@100.998,62.95 ; v1(100.498,64.45) IC4.B12@100.998,63.95 ; v2(100.748,86.029) 100.802,86.029 100.971,85.86 101.388,85.86 C23.1@101.548,85.7 ; v2(100.748,86.7) C25.1@101.548,86.7 ; v2(100.973,84.1) 101.009,84.1 101.249,83.86 101.388,83.86 C28.1@101.548,83.7 ; IC4.R12@100.998,50.95 v1(101.498,50.45) ; IC4.J12@100.998,56.95 v1(101.498,57.45) ; IC4.G12@100.998,58.95 v1(101.498,59.45) ; IC4.E12@100.998,60.95 v1(101.498,61.45) ; IC4.D12@100.998,61.95 v1(101.498,62.45) ; IC4.A12@100.998,64.95 101.036,64.988 101.036,65.311 101.173,65.448 v1(101.173,65.475) ; v2(101.023,82.95) 101.363,82.61 101.388,82.61 C24.1@101.548,82.45 101.523,82.425 101.523,81.825 v2(101.498,81.8) ; R80.2@101.079,74.701 101.079,74.681 101.219,74.541 101.546,74.541 101.722,74.366 v2(101.722,73.9) ; v2(101.898,2.25) 102.698,2.25 C230.1@102.748,2.2 102.725,2.223 v2(102.725,3.175) ; v1(101.898,11.698) 101.899,11.699 101.899,12.224 C241.1@101.9,12.225 ; IC4.P13@101.998,51.95 v1(102.498,51.45) ; IC4.D13@101.998,61.95 v1(102.499,62.451) ; IC8.18@102.448,26.95 v2(102.448,27.525) ; IC4.U14@102.998,48.95 v1(103.498,48.45) ; IC4.G14@102.998,58.95 v1(103.498,59.45) ; v2(103.473,81.925) 103.498,81.95 IC2.24@104.048,81.95 ; v2(103.698,73.95) C100.1@104.998,73.95 v2(106.248,73.95) ; IC4.Y15@103.998,45.95 v1(104.498,45.45) ; IC4.K15@103.998,55.95 v1(104.498,56.45) ; C26.1@104.248,88.65 v2(104.248,89.45) ; R290.1@104.345,9.5 v1(104.8,9.5) 105.698,9.5 v2(105.698,8.85) ; R198.1@104.345,10.45 104.358,10.463 104.76,10.463 v1(104.773,10.477) v1@104.823,10.477 ; v2(104.498,35.95) C110.1@104.498,37.45 104.498,37.775 104.923,38.2 105.451,38.2 105.497,38.246 v2(105.552,38.246) ; v1(104.573,63.375) IC4.C16@104.998,62.95 ; IC4.N16@104.998,52.95 105.49,52.458 v1(105.496,52.458) ; v2(105.7,10.525) 105.7,9.748 C243.1@105.748,9.7 ; IC4.T17@105.998,49.95 v1(106.498,49.45) ; IC4.F17@105.998,59.95 v1(106.498,60.45) ; v2(106.073,31.075) 106.111,31.113 106.711,31.113 C76.1@106.748,31.15 107.085,31.487 107.36,31.487 v2(107.398,31.525) ; C27.1@106.248,88.65 v2(106.248,89.45) ; v2(106.63,14.489) 106.63,13.695 106.65,13.675 v2(106.65,13) ; v2(106.825,-1.5) 106.857,-1.532 107.73,-1.532 C228.1@107.748,-1.55 107.764,-1.534 108.639,-1.534 v2(108.648,-1.525) ; v2(106.998,2.7) 107.498,2.7 C229.1@107.748,2.95 107.748,3.848 v2(107.75,3.85) ; IC4.W18@106.998,46.95 v1(107.498,46.45) ; IC4.J18@106.998,56.95 v1(107.498,57.45) ; v2(107.298,29.375) IC9.2@108.348,29.375 ; v1(107.498,64.45) IC4.B19@107.998,63.95 ; v1(107.499,53.449) IC4.M19@107.998,53.949 ; C22.1@107.748,88.65 108.072,88.974 108.422,88.974 v2(108.448,89) ; IC4.AB19@107.998,43.95 107.998,43.896 108.098,43.796 108.098,43.751 108.305,43.544 108.354,43.544 v1(108.373,43.525) ; v2@108.025,5.372 108.443,5.79 108.463,5.79 108.603,5.93 R192.2@108.603,5.95 ; IC2.9@108.248,86.15 108.248,86.621 108.398,86.771 v2(108.398,86.825) ; IC9.12@108.348,22.875 108.423,22.95 109.247,22.95 v2(109.523,23.225) 109.472,23.225 109.247,23.45 108.423,23.45 IC9.11@108.348,23.525 ; IC4.R20@108.998,50.95 v1(109.498,50.45) ; IC4.E20@108.998,60.95 v1(109.498,61.45) ; v2(109.937,7.565) T7.3@111.048,7.565 111.056,7.558 112.166,7.558 v2(112.173,7.55) ; IC4.V21@109.998,47.95 v1(110.498,47.45) ; IC4.H21@109.998,57.95 110.479,58.431 v1(110.498,58.431) ; v2(110.373,15.8) 110.373,16.8 110.399,16.825 111.366,16.825 v2(111.379,16.812) ; IC4.AA22@110.998,44.95 v1(111.498,44.45) ; IC4.L22@110.998,54.95 v1(111.498,54.95) ; IC4.A22@110.998,64.95 v1(111.498,65.45) ; v2(112.698,90.075) OSC1.3@114.108,90.075 v2(114.108,88.81) ; IC9.13@114.148,22.875 114.13,22.893 113.199,22.893 113.023,23.069 v2(113.023,23.5) ; IC9.14@114.148,23.525 114.136,23.513 113.036,23.513 v2(113.023,23.5) ; IC9.15@114.148,24.175 114.105,24.132 113.199,24.132 113.023,23.956 v2(113.023,23.5) ; IC9.22@114.148,28.725 v2(115.237,28.725) ; v2(114.398,44.65) 114.423,44.625 114.973,44.625 C188.1@114.998,44.6 ; v2(114.998,78.925) IC3.20@114.998,79.55 ; IC3.11@114.998,83.85 v2(114.998,84.55) ; v2(115.051,30.552) 115.105,30.552 115.148,30.51 115.662,30.51 C75.1@115.822,30.35 ; IC3.5@116.398,81.45 117.037,81.45 v2(117.048,81.461) ; R273.1@117,32.155 117.02,32.155 117.16,32.015 117.16,31.995 117.405,31.75 119.899,31.75 v2(119.934,31.785) ; v2(117.473,3.525) 118.473,3.525 118.848,3.9 v2(119.473,3.9) ; v2(117.498,14.2) 117.536,14.162 117.627,14.162 117.864,13.924 117.864,13.746 118.26,13.35 118.598,13.35 118.998,13.75 v2(118.998,14.2) ; v1(118.516,50.762) 118.523,50.762 118.742,50.981 119.029,50.981 IC11.B9@119.048,51 ; IC15.22@118.598,24.175 118.673,24.1 119.526,24.1 119.65,23.976 v2(119.704,23.976) ; IC15.13@118.598,30.025 118.673,29.95 119.402,29.95 119.779,29.573 119.779,29.121 v2(119.8,29.1) ; v1(118.598,60.632) 118.945,60.632 118.958,60.619 119.029,60.619 IC11.P9@119.048,60.6 ; v1(118.618,55.325) 118.637,55.306 118.715,55.306 119.021,55 IC11.G9@119.042,55 ; v1(118.648,62.475) 118.667,62.456 118.791,62.456 IC11.T9@119.048,62.2 ; v1(118.673,58.625) IC11.M9@119.048,59 ; v1(118.694,54.489) 118.721,54.489 118.86,54.35 118.871,54.35 119.021,54.2 IC11.F9@119.042,54.2 ; C39.1@118.698,81.7 119.163,82.165 119.317,82.165 v2(119.355,82.203) ; R23.2@118.718,79.7 118.733,79.715 118.733,80.335 v2(118.748,80.35) ; IC11.A9@119.048,50.2 119.429,49.819 119.479,49.819 v1(119.498,49.8) ; v1(119.456,55.325) 119.475,55.306 119.515,55.306 119.821,55 IC11.G8@119.848,55 ; v2(119.473,0.325) 119.486,0.337 119.486,0.968 R191.1@119.498,0.98 ; v1(119.482,57.074) 119.501,57.055 119.501,56.974 119.848,56.627 IC11.J8@119.848,56.6 ; v1(119.493,52.803) 119.512,52.784 119.557,52.784 119.741,52.6 IC11.D8@119.788,52.6 ; v1(119.507,53.67) 119.526,53.651 119.57,53.651 119.802,53.419 119.829,53.419 IC11.E8@119.848,53.4 ; v2(119.937,2.951) 119.991,2.951 120.132,2.81 120.338,2.81 C238.1@120.498,2.65 ; IC32.30@120.248,8.2 123.498,8.2 IC32.49@123.748,7.95 125.998,5.7 IC32.2@127.248,5.7 ; v2(120.523,85.275) 120.233,84.985 120.233,84.81 C31.1@120.073,84.65 120.233,84.49 120.394,84.49 120.409,84.475 v2(120.698,84.475) ; v2(121.198,14.7) C231.2@121.198,16.2 ; v2(121.248,17.725) 121.248,16.25 C231.2@121.198,16.2 ; IC32.23@121.498,11.45 121.498,11.725 121.5,11.727 v1(121.5,13.086) ; IC32.21@122.498,11.45 v1(122.498,14.098) ; v2(122.548,16.2) C231.2@121.198,16.2 ; R212.1@122.748,1.73 122.761,1.718 122.761,1.062 v2(122.773,1.05) ; v2(123.348,1.1) 123.348,1.136 123.588,1.376 123.588,1.59 C259.1@123.748,1.75 124.098,1.4 v2(124.098,1.15) ; v1(123.451,51.385) 123.463,51.385 IC11.B3@123.848,51 ; R185.1@123.468,-0.3 123.47,-0.297 123.47,0.372 v2(123.473,0.375) ; IC32.19@123.498,11.45 123.498,12.071 123.623,12.196 v2(123.623,12.25) ; v2(123.598,21) 123.56,21.038 123.56,21.663 C179.1@123.498,21.725 124.273,21.725 v2(124.298,21.7) ; IC32.18@123.998,11.45 123.998,12.074 v2(124.198,12.275) v2(124.198,12.275) ; v2(124.323,-1.275) 124.326,-1.272 124.996,-1.272 R205.1@124.998,-1.27 ; IC15.7@124.398,26.775 124.466,26.843 125.322,26.843 125.498,27.019 v2(125.498,27.45) ; IC15.8@124.398,27.425 124.411,27.438 125.486,27.438 v2(125.498,27.45) ; IC15.9@124.398,28.075 124.441,28.032 125.322,28.032 125.498,27.856 v2(125.498,27.45) ; IC15.10@124.398,28.725 124.473,28.8 125.332,28.8 125.573,29.041 v2(125.573,29.3) ; IC15.11@124.398,29.375 124.424,29.349 125.47,29.349 125.519,29.3 v2(125.573,29.3) ; IC15.12@124.398,30.025 124.404,30.019 125.397,30.019 125.573,29.844 v2(125.573,29.3) ; IC32.17@124.498,11.45 124.498,11.828 124.735,12.064 124.735,12.212 v2(124.773,12.25) ; IC11.E2@124.648,53.4 v1(125.048,53.8) ; IC11.J2@124.648,56.6 124.648,56.575 v1(125.048,56.175) ; v2(124.748,1.125) C258.1@124.748,1.75 ; v1(125.051,51.385) 125.063,51.385 IC11.B1@125.448,51 ; v1(125.051,52.985) 125.063,52.985 IC11.D1@125.448,52.6 ; v1(125.051,59.385) 125.063,59.385 IC11.M1@125.448,59 ; v1(125.051,62.585) 125.063,62.585 IC11.T1@125.448,62.2 ; v1(125.073,54.625) IC11.G1@125.448,55 ; IC11.E1@125.448,53.4 125.473,53.4 v1(125.798,53.075) ; IC11.P1@125.448,60.6 125.467,60.619 125.538,60.619 125.544,60.625 v1(125.898,60.625) ; R66.1@125.718,64.7 125.718,65.112 v2(125.95,65.344) ; IC32.49@125.998,10.2 IC32.11@127.248,10.2 ; IC22.10@126.148,39.025 126.161,39.038 v2@127.513,39.038 ; v2(126.273,18.3) 126.273,17.45 R211.1@126.298,17.425 ; IC32.13@126.498,11.45 126.498,11.725 126.622,11.725 v2(126.898,12) ; v2@126.652,3.25 v2(126.598,3.25) 126.636,3.212 126.636,3.012 C249.1@126.998,2.65 127.298,2.95 127.298,3.245 v2(127.304,3.251) v2@127.25,3.251 ; C185.1@126.998,34.5 127.122,34.376 v2@127.617,34.376 ; C254.1@127.248,12.9 127.273,12.9 127.598,13.225 127.598,13.25 128.082,13.734 v2(128.107,13.734) ; v2(127.648,-0.775) 128.473,-0.775 C251.1@128.498,-0.8 129.173,-1.475 v2(129.173,-1.525) ; v2(127.973,11.4) 128.973,11.4 129.178,11.605 130.214,11.605 v2(130.225,11.616) ; C84.1@128.398,60.025 v2(129.073,60.025) ; v2(128.4,4.05) C235.1@129.498,4.05 v2(130.573,4.05) ; C79.1@128.5,55.994 128.5,55.269 128.575,55.344 v2(128.6,55.344) ; R69.1@128.718,57.2 v2(129.373,57.2) ; R67.1@128.718,58.2 v2(129.373,58.2) ; v2(129.373,17.775) 129.409,17.739 129.959,17.739 130.073,17.625 130.073,17.375 C255.1@130.248,17.2 ; C257.1@129.773,8.35 129.91,8.487 130.309,8.487 v2(130.347,8.525) ; v2(130.248,16.45) C255.1@130.248,17.2 ; D1.1@130.698,90.6 130.711,90.588 130.711,89.713 v2(130.723,89.7) ; C260.1@130.973,8.4 131.223,8.65 131.223,8.7 131.453,8.93 v2(131.453,8.976) ; v2(131.248,59.4) C184.1@131.998,59.4 ; v2(131.4,86.15) C72.1@132.5,86.15 v2(133.55,86.15) ; v2(132.838,83.287) 132.89,83.287 133.6,82.577 133.275,82.252 v2(133.275,81.35) ; R216.1@132.998,6.98 133.001,6.978 133.645,6.978 v2(133.648,6.975) ; v2(133.306,75.283) 133.306,75.337 133.425,75.456 133.425,75.827 134.075,76.477 134.075,76.676 134.3,76.901 v2(134.3,76.952) ; v2(134.146,74.443) 134.146,74.497 134.325,74.677 134.325,74.852 134.375,74.902 C202.1@134.4,74.902 134.412,74.914 134.412,75.414 v2(134.425,75.427) ; v2(134.173,-0.125) 134.184,-0.114 134.184,0.386 C250.1@134.498,0.7 v2(135.248,1.45) ; v2(134.429,81.309) 134.429,81.255 134.6,81.085 134.6,80.852 134.75,80.702 IC35.2@134.75,80.452 ; v2(134.748,58.45) IC19.2@135.598,58.45 ; R94.1@140.498,64.67 v2(140.498,65.275) ; J2.13@140.748,72.075 v2(140.748,73.875) ; J2.11@142.748,72.075 v2(142.748,73.8) ; J2.9@144.748,72.075 v2(144.748,73.775) ; v2(145.45,6.75) 145.975,6.225 IC26.4@147.478,6.225 ; v2(145.698,59.575) 145.752,59.575 145.877,59.45 R95.1@147.028,59.45 ; v2(146.05,7.5) IC26.3@147.3,7.5 ; v2(146.05,8.596) 146.104,8.596 146.196,8.688 146.971,8.688 IC26.2@147.083,8.8 ; v2(146.225,10.1) 146.248,10.078 147.276,10.078 IC26.1@147.298,10.055 ; D3.7@146.498,64.45 147.239,64.45 147.258,64.469 v2@148.404,64.469 ; v2(146.575,22.25) 146.593,22.25 146.843,22.5 C226.1@147.475,22.5 ; v2(146.598,57.3) 147.048,57.75 C180.1@147.048,58.45 R95.1@147.048,59.49 ; J2.7@146.748,72.075 v2(146.748,73.925) ; R95.1@147.028,59.475 147.033,59.475 R95.1@147.048,59.49 ; IC25.4@147.298,11.795 v2(148.493,11.795) ; IC25.3@147.298,13.065 v2(148.488,13.065) ; IC25.2@147.298,14.335 v2(148.488,14.335) ; IC25.1@147.298,15.605 148.518,15.605 v2(148.523,15.6) ; v2(147.929,60.376) 147.168,59.615 147.168,59.61 R95.1@147.048,59.49 ; J2.5@148.748,72.075 v2(148.748,73.875) ; D8.7@150.248,18.2 151.487,18.2 v2(151.506,18.219) ; J2.3@150.748,72.075 v2(150.748,73.825) ; v1(151.8,16.9) 151.819,16.919 152.35,16.919 C219.1@152.375,16.944 ; v2@152.041,52.5 v2(152.007,52.466) 152.505,51.968 152.505,51.018 IC16.8@152.523,51 ; IC31.4@152.153,24 152.278,24.125 v1(152.95,24.125) ; J2.1@152.748,72.075 v2(152.748,73.875) ; v2(154.223,8.325) 154.236,8.337 154.236,8.988 154.248,9 v2(154.961,9) ; v1(156.025,4.65) R129.1@156.73,4.65 ; v2(159.225,10) 159.225,9.946 159.279,9.892 159.279,8.854 C43.2@159.502,8.63 159.547,8.675 v2(160.625,8.675) ; v1(161.75,2.075) T26.2@162.694,2.075 ; v2(162.75,7) IC14.2@164.05,7 ; v2(166.318,7.602) 166.338,7.582 C40.1@167.431,7.582 ; v2(167.45,8.6) 167.45,7.731 C40.1@167.515,7.666 ; v2(168,63.5) 168.975,63.5 C263.1@169,63.525 169.309,63.216 v2(169.716,63.216) ; v2(168,68.75) C262.1@169,68.75 v2(170,68.75) ; C262.1@169,68.65 C262.1@169.309,68.959 ; v2(169.25,12.375) 169.264,12.361 C166.1@170.257,12.361 ; v2(170.825,69.8) 170.847,69.778 D10.2@171.4,69.778 ; D10.2@171.633,69.968 171.643,69.959 171.643,69.243 171.358,68.959 171.358,69.034 D10.2@172.283,69.959 172.583,69.959 D10.2@172.783,70.159 ; IC39.1@171.798,8.855 171.864,8.789 172.989,8.789 v2(173.025,8.825) ; D10.2@173.208,70.584 D10.2@172.783,70.159 ; v2(173.708,70.159) D10.2@172.783,70.159 ; v2(174.283,70.559) 174.338,70.559 174.387,70.509 FL1.4@176.683,70.509 ; v2(176.015,3.69) 176.019,3.694 C165.1@176.765,3.694 ; v2(176.575,11.1) 176.582,11.093 177.226,11.093 C155.1@177.265,11.053 ; v2@176.776,16.576 R269.1@177.423,16.576 ; v2(176.783,68.809) 176.749,68.843 176.749,70.443 FL1.4@176.683,70.509 ; v2(176.783,72.309) 176.783,72.255 176.683,72.155 FL1.4@176.683,70.509 ; v2(178.033,62.809) FL1.4@179.883,62.809 ; v2(178.033,63.809) FL1.4@179.683,63.809 ; v2(178.033,73.309) 178.088,73.309 178.188,73.409 FL1.4@180.868,73.409 ; T25.2@178.741,15.624 178.75,15.615 v2(178.75,14.9) ; v2(179.033,70.559) 178.999,70.525 176.699,70.525 FL1.4@176.683,70.509 ; T24.2@179.05,12.4 179.186,12.536 179.737,12.536 179.796,12.596 v2(179.85,12.596) ; C154.1@179.241,5.098 179.35,4.988 v2(179.35,4.225) ; v2(179.283,61.559) 179.283,62.209 FL1.4@179.883,62.809 ; v2(179.283,64.809) 179.283,64.209 FL1.4@179.683,63.809 ; C154.1@179.375,5.1 v2(180.4,5.1) ; v2(179.7,55.2) 179.712,55.212 179.712,55.885 R13.1@179.724,55.897 ; v2(179.783,75.059) 179.783,75.005 179.868,74.92 179.868,74.409 FL1.4@180.868,73.409 ; v2(180.283,61.559) FL1.4@180.283,63.209 ; v2(180.533,71.809) 180.568,71.843 180.568,72.409 FL1.4@181.568,73.409 ; v2(180.783,64.809) 180.783,63.709 FL1.4@180.283,63.209 ; v2(181.283,61.559) 181.283,62.209 FL1.4@180.283,63.209 ; v2(181.283,75.059) 181.283,74.409 FL1.4@182.283,73.409 ; v2(182.283,71.809) 182.318,71.843 182.318,73.193 FL1.4@182.533,73.409 ; v2(182.783,75.059) 182.783,75.005 182.699,74.92 182.699,73.575 FL1.4@182.533,73.409 ; v2(184.033,71.809) 183.999,71.843 183.999,72.409 FL1.4@182.999,73.409 ; v2(184.033,75.059) 184.033,75.005 183.958,74.929 183.958,74.409 FL1.4@182.958,73.409 ; v2(185.283,71.809) 185.249,71.843 185.249,72.409 FL1.4@184.249,73.409 ; v2(185.283,75.059) 185.283,75.005 185.199,74.92 185.199,74.409 FL1.4@184.199,73.409 ; v2(187.033,73.309) 186.979,73.309 186.879,73.409 FL1.4@184.249,73.409 ; v2(187.9,9.2) D6.2@188.738,9.2 D6.7@189.498,9.2 ; v2(188,5.45) D5.7@189.498,5.45 ; v2(188.061,14.96) D7.2@188.698,14.96 ; D7.2@188.738,14.95 D7.7@189.498,14.95 ; FL1.4@179.683,63.809 FL1.4@180.283,63.209 ; FL1.4@179.684,63.809 FL1.4@180.283,63.209 ; FL1.4@179.883,62.809 FL1.4@180.283,63.209 ; FL1.4@179.883,62.809 FL1.4@180.283,63.209 ; FL1.4@180.868,73.409 FL1.4@181.568,73.409 ; FL1.4@181.568,73.409 FL1.4@182.283,73.409 ; FL1.4@182.283,73.409 FL1.4@182.533,73.409 ; FL1.4@182.533,73.409 FL1.4@182.958,73.409 ; FL1.4@182.958,73.409 FL1.4@182.999,73.409 ; FL1.4@182.999,73.409 FL1.4@184.199,73.409 ; FL1.4@184.199,73.409 FL1.4@184.249,73.409
  TopLayer w0.5: v2(6.375,87.025) R126.2@6.375,88.25 ; v2(6.4,89.325) 6.4,88.275 R126.2@6.375,88.25 ; v2(7.25,88.25) R126.2@6.375,88.25 ; v2(75.423,14.275) 75.423,14.175 75.773,13.825 75.773,13.65 76.073,13.35 C266.1@76.248,13.35 v2(77.398,13.35) ; v2(79.698,14.65) C265.2@79.698,16.2 79.723,16.225 v2(79.723,17.7) ; v2(80.948,14.55) R240.1@80.948,13.7 80.998,13.65 v2(80.998,12.875)